# Altium PCB HCD_PCB.PcbDoc (part 2 of 4)
Units mil, origin at the board's own origin, x right, y up, seen from the top; angles counter-clockwise.
Board outline 2762.03 x 3428.03 mil, 2 copper layers (Top Layer, Bottom Layer), stack 57 mil thick; 112 components, 73 nets, 363 pads, 145 vias.
Unrouted connection lines stored in the file: 1.
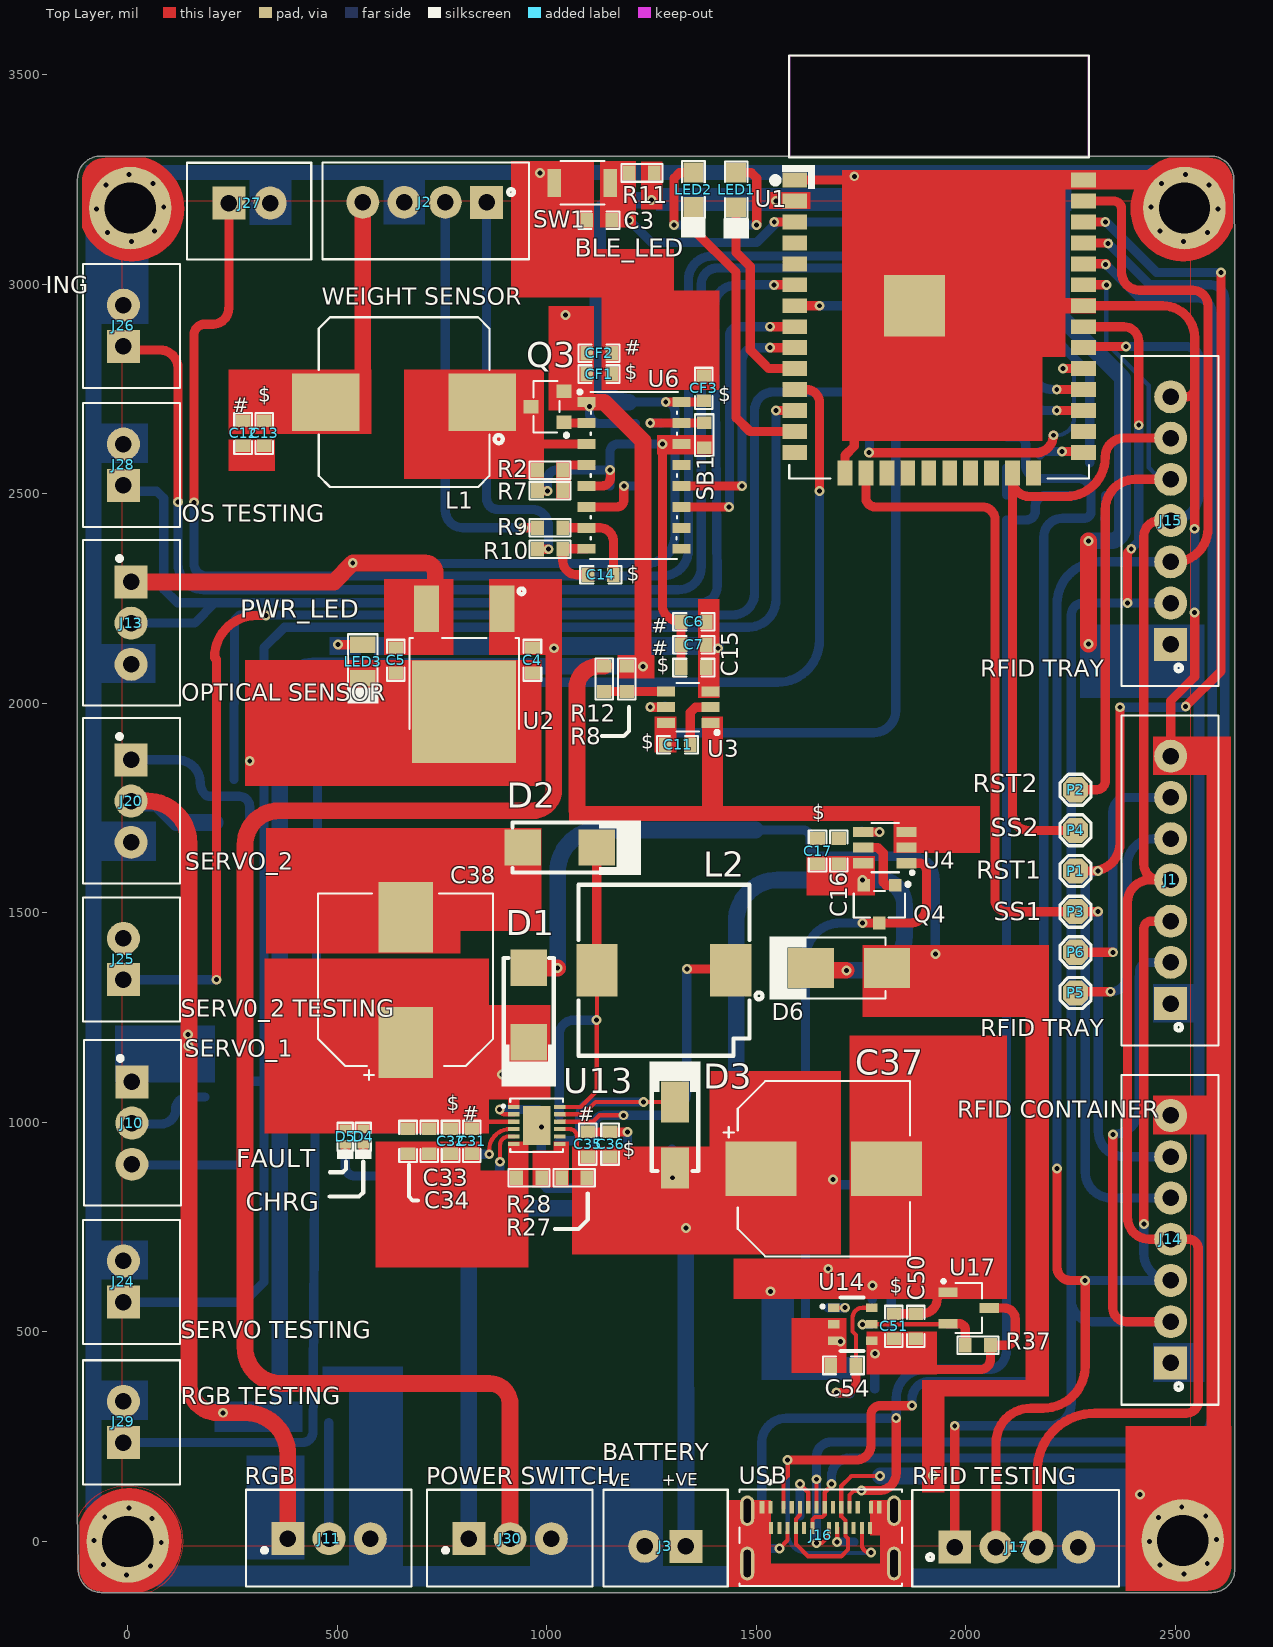
[diagram p0: Top Layer view]

## Part data (continued)
L2: library part SLF10145T-100M2R5-PF, "FIXED IND 10UH 2.5A 43.7 MOHM", Case/Package=Nonstandard, Current Rating=2.5A, DC Resistance (DCR)=36.4mR, Inductance Tolerance=20%, Manufacturer=TDK, Max Operating Temperature=105°C, Min Operating Temperature=-40°C, Package Quantity=500, Rated Current-Max=3A, Resistor Type=Wirewound, Supplier Part Number 1=445-1975-6-ND, Test Frequency=1kHz, ComponentLink1Description=http://www.farnell.com/datasheets/1838969.pdf?src-supplier=Element14, ComponentLink1URL=http://www.farnell.com/datasheets/1838969.pdf?src-supplier=Element14, ComponentLink2Description=http://uk.rs-online.com/webdocs/14e9/0900766b814e91a9.pdf?src-supplier=RSComponents, ComponentLink2URL=http://uk.rs-online.com/webdocs/14e9/0900766b814e91a9.pdf?src-supplier=RSComponents, ComponentLink3Description=http://components.arrow.com/part/dataview/42010891S8914805N1165?src-supplier=Arrow+Electronics, ComponentLink3URL=http://components.arrow.com/part/dataview/42010891S8914805N1165?src-supplier=Arrow+Electronics, ComponentLink4Description=http://datasheet.iiic.cc/tdk/SLF10145T-100M2R5-PF.pdf?src-supplier=IIIC, ComponentLink4URL=http://datasheet.iiic.cc/tdk/SLF10145T-100M2R5-PF.pdf?src-supplier=IIIC, Core Material=Ferrite, DC Current=2.5A, Depth=10.4mm, Height=4.5mm, Height - Seated (Max)=0.189inch, Inductance=10uH, Lead Free="Lead Free", Length=10.1mm, Manufacturer Part Number=SLF10145T-100M2R5-PF, Max DC Current=2.5A, Military Standard=Not, Mount="Surface Mount", Number of Pins=2, Packaging="Tape and Reel", Pricing 1="1=1.05, 10=0.975, 25=0.9, 50=0.75, 100=0.705, 250=0.63 (USD)", Radiation Hardening=No, REACH SVHC="No SVHC", RMS Current (Irms)=3A, RoHS Compliant=Yes, Saturation Current=3A, Series=SLF, Shielding=Shielded, Stock 1=3269, Supplier 1=Digi-Key, Termination=SMD/SMT, Tolerance=20%, Width=0.398inch
LED1: "Yellow 2 x 1.25 x 1.1 mm 130° Water Clear 112 mcd 1.8 V LED Surface Mount", Case Code (Imperial)=0805, Case Code (Metric)=2012, Color=Yellow, Forward Current=30mA, Forward Voltage=2.4V, Lens Color=Colorless, Manufacturer="Vishay Lite-On", Max Operating Temperature=85°C, Min Operating Temperature=-55°C, Package Quantity=1, Power Dissipation=75mW, Reverse Voltage=5V, Supplier Part Number 1=160-1416-1-ND, Test Current=20mA, Case/Package=0805, Category=LEDs, ComponentLink1Description=https://datasheet.ciiva.com/11774/0900766b80dc027c-11774116.pdf?src-supplier=RSComponents, ComponentLink1URL=https://datasheet.ciiva.com/11774/0900766b80dc027c-11774116.pdf?src-supplier=RSComponents, ComponentLink2Description=https://datasheet.ciiva.com/12400/lite-on-ltst-c170kskt-187240-12400806.pdf?src-supplier=Mouser, ComponentLink2URL=https://datasheet.ciiva.com/12400/lite-on-ltst-c170kskt-187240-12400806.pdf?src-supplier=Mouser, ComponentLink3Description=https://datasheet.ciiva.com/16203/ltst-c170kskt-16203829.pdf?src-supplier=Future+Electronics, ComponentLink3URL=https://datasheet.ciiva.com/16203/ltst-c170kskt-16203829.pdf?src-supplier=Future+Electronics, ComponentLink4Description=https://datasheet.ciiva.com/15118/getdatasheetpartid-214541-15118098.pdf?src-supplier=Verical, ComponentLink4URL=https://datasheet.ciiva.com/15118/getdatasheetpartid-214541-15118098.pdf?src-supplier=Verical, ComponentLink5Description=https://datasheet.ciiva.com/2110/s-110-ltst-c170kskt-2110046.pdf?src-supplier=Digi-Key, ComponentLink5URL=https://datasheet.ciiva.com/2110/s-110-ltst-c170kskt-2110046.pdf?src-supplier=Digi-Key, ComponentLink6Description=https://datasheet.ciiva.com/2110/s-110-ltst-c170kskt-2110045.pdf?src-supplier=Digi-Key, ComponentLink6URL=https://datasheet.ciiva.com/2110/s-110-ltst-c170kskt-2110045.pdf?src-supplier=Digi-Key, ComponentLink7Description=https://datasheet.ciiva.com/2110/s-110-ltst-c170kskt-2110047.pdf?src-supplier=Digi-Key, ComponentLink7URL=https://datasheet.ciiva.com/2110/s-110-ltst-c170kskt-2110047.pdf?src-supplier=Digi-Key, Depth=1.25mm, Dominant Wavelength=587nm, Height=1.1mm, Illumination Color=Yellow, Lead Free="Lead Free", Length=2mm, Lens Style=Diffused,Colorless,Rectangular,Clear, Lens Transparency=Clear, Luminous Intensity=112mcd, Manufacturer Part Number=LTST-C170KSKT, Mount="Surface Mount", Number of Elements=1, Number of LEDs=1, Number of Pins=2, Packaging="Tape and Reel", Power Rating=75mW, Pricing 1="1=0.31000, 10=0.16900, 100=0.07860, 500=0.07260, 1000=0.05687 (USD)", Radiation Hardening=No, RoHS=Yes, RoHS Compliant=Yes, Series="CHIPLED 0805", Stock 1=4224, Supplier 1=Digi-Key, Viewing Angle=130°, Wavelength=588nm, Width=1.25mm
LED2: "LED BLUE 0805 SMD", Emitted Color=Blue, Manufacturer="Everlight Elec", Package=0805
LED3: "LED GREEN 574nm 2-Pin Chip 0805 SMD", Case Code (Imperial)=0805, Case Code (Metric)=2012, Color=Green, Forward Current=30mA, Forward Voltage=2.4V, Lens Color=Colorless, Manufacturer="Vishay Lite-On", Max Operating Temperature=85°C, Min Operating Temperature=-55°C, Package Quantity=1, Power Dissipation=75mW, Reverse Voltage=5V, Supplier Part Number 1=6920947P, Test Current=20mA, Case/Package=0805, Category=LEDs, ComponentLink1Description=https://datasheet.ciiva.com/11774/0900766b80dc0298-11774377.pdf?src-supplier=RSComponents, ComponentLink1URL=https://datasheet.ciiva.com/11774/0900766b80dc0298-11774377.pdf?src-supplier=RSComponents, ComponentLink2Description=https://datasheet.ciiva.com/12400/lite-on-ltst-c171kgkt-187692-12400799.pdf?src-supplier=Mouser, ComponentLink2URL=https://datasheet.ciiva.com/12400/lite-on-ltst-c171kgkt-187692-12400799.pdf?src-supplier=Mouser, ComponentLink3Description=https://datasheet.ciiva.com/16200/lite-on20ltst-c171kgkt-16200100.pdf?src-supplier=Future+Electronics, ComponentLink3URL=https://datasheet.ciiva.com/16200/lite-on20ltst-c171kgkt-16200100.pdf?src-supplier=Future+Electronics, ComponentLink4Description=https://datasheet.ciiva.com/15118/getdatasheetpartid-214542-15118099.pdf?src-supplier=Verical, ComponentLink4URL=https://datasheet.ciiva.com/15118/getdatasheetpartid-214542-15118099.pdf?src-supplier=Verical, ComponentLink5Description=https://datasheet.ciiva.com/2110/s-110-ltst-c171kgkt-2110073.pdf?src-supplier=Digi-Key, ComponentLink5URL=https://datasheet.ciiva.com/2110/s-110-ltst-c171kgkt-2110073.pdf?src-supplier=Digi-Key, ComponentLink6Description=https://datasheet.ciiva.com/2110/s-110-ltst-c171kgkt-2110072.pdf?src-supplier=Digi-Key, ComponentLink6URL=https://datasheet.ciiva.com/2110/s-110-ltst-c171kgkt-2110072.pdf?src-supplier=Digi-Key, ComponentLink7Description=https://datasheet.ciiva.com/2110/s-110-ltst-c171kgkt-2110074.pdf?src-supplier=Digi-Key, ComponentLink7URL=https://datasheet.ciiva.com/2110/s-110-ltst-c171kgkt-2110074.pdf?src-supplier=Digi-Key, Depth=1.25mm, Dominant Wavelength=571nm, Height=0.8mm, Illumination Color=Green, Lead Free="Lead Free", Length=2mm, Lens Style=Rectangular,Diffused,Colorless,Clear, Lens Transparency=Clear, Luminous Intensity=35mcd, Manufacturer Part Number=LTST-C171KGKT, Mount="Surface Mount", Number of Elements=1, Number of LEDs=1, Number of Pins=2, Packaging="Tape and Reel", Power Rating=75mW, Pricing 1="250=0.05900, 500=0.05000, 1250=0.04200, 2500=0.03900 (GBP)", Radiation Hardening=No, RoHS=Yes, RoHS Compliant=Yes, Series="CHIPLED 0805", Stock 1=14250, Supplier 1=RSComponents, Viewing Angle=130°, Wavelength=574nm, Width=1.25mm
P1 P2 P3 P4 P5 P6: library part "TEST POINT", "Test Point ON"
Q1 Q2: "TRANS NPN 40V 0.6A SMD SOT23-3", Case/Package=SOT-23, Collector Base Voltage (VCBO)=75V, Collector Emitter Breakdown Voltage=40V, Collector Emitter Saturation Voltage=1V, Continuous Collector Current=600mA, Current=1A, Emitter Base Voltage (VEBO)=6V, Frequency=300MHz, Manufacturer=Diodes, Max Operating Temperature=150°C, Max Power Dissipation=300mW, Min Operating Temperature=-55°C, Package Quantity=3000, Power Dissipation=350mW, Supplier Part Number 1=MMBT2222A-FDIDKR-ND, Collector Emitter Voltage (VCEO)=40V, ComponentLink1Description=http://www.diodes.com/datasheets/ds30041.pdf?src-supplier=Future+Electronics, ComponentLink1URL=http://www.diodes.com/datasheets/ds30041.pdf?src-supplier=Future+Electronics, ComponentLink2Description=http://www.diodes.com/datasheets/ds30041.pdf?src-supplier=Avnet, ComponentLink2URL=http://www.diodes.com/datasheets/ds30041.pdf?src-supplier=Avnet, ComponentLink3Description=https://www.verical.com/server-webapp/html/getDatasheet?partID=82692&src-supplier=Verical, ComponentLink3URL=https://www.verical.com/server-webapp/html/getDatasheet?partID=82692&src-supplier=Verical, ComponentLink4Description=https://www.diodes.com/assets/Datasheets/ds30041.pdf?src-supplier=Digi-Key, ComponentLink4URL=https://www.diodes.com/assets/Datasheets/ds30041.pdf?src-supplier=Digi-Key, ComponentLink5Description=http://www.diodes.com/datasheets/ds30041.pdf?src-supplier=Avnet+Europe, ComponentLink5URL=http://www.diodes.com/datasheets/ds30041.pdf?src-supplier=Avnet+Europe, ComponentLink6Description=http://www.diodes.com/datasheets/ds30041.pdf?src-supplier=Element14, ComponentLink6URL=http://www.diodes.com/datasheets/ds30041.pdf?src-supplier=Element14, Contact Plating=Matte,Tin, Current Rating=600mA, Element Configuration=Single, Gain Bandwidth Product=300MHz, Height=1mm, hFE Min=100, Lead Free="Lead Free", Length=3.05mm, Manufacturer Part Number=MMBT2222A-7-F, Max Breakdown Voltage=40V, Max Collector Current=600mA, Max Frequency=300MHz, Mount="Surface Mount", Number of Elements=1, Number of Pins=3, Packaging="Tape and Reel", Polarity=NPN, Pricing 1="1=0.15, 10=0.134, 100=0.0729, 500=0.04486, 1000=0.03059 (USD)", Radiation Hardening=No, REACH SVHC="No SVHC", Stock 1=2471182, Supplier 1=Digi-Key, Termination=SMD/SMT, Transition Frequency=300MHz, Voltage=40V, Voltage Rating (DC)=40V, Weight=0.000282oz, Width=1.4mm
Q3: "TRANS PNP 40V 600MA SOT23-3", Case/Package=SOT-23-3, Collector Base Voltage (VCBO)=40V, Collector Emitter Saturation Voltage=-750mV, Collector-emitter Voltage-Max=750mV, Current Rating=-600mA, Emitter Base Voltage (VEBO)=5V, Frequency=200MHz, Manufacturer="ON Semiconductor", Max Collector Current=600mA, Max Operating Temperature=150°C, Max Power Dissipation=300mW, Min Operating Temperature=-55°C, Package Quantity=1, Supplier Part Number 1=88H4792, Voltage Rating (DC)=-40V, Category=BJTs, Collector Emitter Breakdown Voltage=40V, Collector Emitter Voltage (VCEO)=40V, ComponentLink1Description=http://www.onsemi.com/pub/Collateral/MMBT4403LT1-D.PDF?src-supplier=Avnet, ComponentLink1URL=http://www.onsemi.com/pub/Collateral/MMBT4403LT1-D.PDF?src-supplier=Avnet, ComponentLink2Description=http://www.onsemi.com/pub/Collateral/MMBT4403LT1-D.PDF?src-supplier=Digi-Key, ComponentLink2URL=http://www.onsemi.com/pub/Collateral/MMBT4403LT1-D.PDF?src-supplier=Digi-Key, ComponentLink3Description=https://datasheet.ciiva.com/4722/mmbt4403lt1-d-101652-4722132.pdf?src-supplier=Mouser, ComponentLink3URL=https://datasheet.ciiva.com/4722/mmbt4403lt1-d-101652-4722132.pdf?src-supplier=Mouser, ComponentLink4Description=https://datasheet.ciiva.com/15138/getdatasheetpartid-44367-15138750.pdf?src-supplier=Verical, ComponentLink4URL=https://datasheet.ciiva.com/15138/getdatasheetpartid-44367-15138750.pdf?src-supplier=Verical, ComponentLink5Description=https://datasheet.ciiva.com/14546/70099534-14546501.pdf?src-supplier=Allied+Electronics, ComponentLink5URL=https://datasheet.ciiva.com/14546/70099534-14546501.pdf?src-supplier=Allied+Electronics, ComponentLink6Description=https://datasheet.ciiva.com/7972/mmbt4403lt1-d-7972391.pdf?src-supplier=Element14, ComponentLink6URL=https://datasheet.ciiva.com/7972/mmbt4403lt1-d-7972391.pdf?src-supplier=Element14, ComponentLink7Description=https://datasheet.ciiva.com/11198/mmbt4403lt1-d-11198713.pdf?src-supplier=Avnet, ComponentLink7URL=https://datasheet.ciiva.com/11198/mmbt4403lt1-d-11198713.pdf?src-supplier=Avnet, ComponentLink8Description=https://datasheet.ciiva.com/16478/mmbt4403lt1-d-16478554.pdf?src-supplier=Avnet+Asia, ComponentLink8URL=https://datasheet.ciiva.com/16478/mmbt4403lt1-d-16478554.pdf?src-supplier=Avnet+Asia, ComponentLink9Description=https://datasheet.ciiva.com/976/mmbt4403lt1-d-976347.pdf?src-supplier=Digi-Key, ComponentLink9URL=https://datasheet.ciiva.com/976/mmbt4403lt1-d-976347.pdf?src-supplier=Digi-Key, ComponentLink10Description=https://datasheet.ciiva.com/16396/mmbt4403lt1-d-16396635.pdf?src-supplier=Future+Electronics, ComponentLink10URL=https://datasheet.ciiva.com/16396/mmbt4403lt1-d-16396635.pdf?src-supplier=Future+Electronics, ComponentLink11Description=https://datasheet.ciiva.com/976/mmbt4403lt1-d-976348.pdf?src-supplier=Digi-Key, ComponentLink11URL=https://datasheet.ciiva.com/976/mmbt4403lt1-d-976348.pdf?src-supplier=Digi-Key, ComponentLink12Description=https://datasheet.ciiva.com/976/mmbt4403lt1-d-976349.pdf?src-supplier=Digi-Key, ComponentLink12URL=https://datasheet.ciiva.com/976/mmbt4403lt1-d-976349.pdf?src-supplier=Digi-Key, ComponentLink13Description=https://datasheet.ciiva.com/25998/mmbt4403lt1-d-25998110.pdf?src-supplier=Avnet+Europe, ComponentLink13URL=https://datasheet.ciiva.com/25998/mmbt4403lt1-d-25998110.pdf?src-supplier=Avnet+Europe, Contact Plating=Tin,Matte, Element Configuration=Single, Gain Bandwidth Product=200MHz, Height=1.01mm, hFE Min=30, Lead Free="Lead Free", Length=3.04mm, Manufacturer Part Number=MMBT4403LT1G, Max Breakdown Voltage=40V, Max Frequency=200MHz, Number of Elements=1, Number of Pins=3, Packaging="Tape and Reel", Polarity=PNP, Power Dissipation=300mW, Pricing 1="1=0.14200, 10=0.09900, 100=0.05400, 500=0.04300 (USD)", Radiation Hardening=No, REACH SVHC="No SVHC", RoHS=Yes, RoHS Compliant=Yes, Series=-, Stock 1=25249, Supplier 1=Avnet, Transition Frequency=200MHz, Width=1.4mm
Q4: "MOSFET P-CH 12V 2.6A SUPERSOT3", Case/Package=TO-236-3, Continuous Drain Current (ID)=2.6A, Current=26A, Current Rating=-2.6A, Drain to Source Breakdown Voltage=-12V, Drain to Source Resistance=40mR, Drain to Source Voltage (Vdss)=12V, Drain-source On Resistance-Max=40MR, Gate to Source Voltage (Vgs)=8V, Input Capacitance=1.138nF, Manufacturer="ON Semiconductor / Fairchild", Max Operating Temperature=150°C, Max Power Dissipation=500mW, Min Operating Temperature=-55°C, Package Quantity=3000, Supplier Part Number 1=FDN306PCT-ND, Threshold Voltage=-600mV, Category=MOSFETs, ComponentLink1Description=https://datasheet.ciiva.com/6383/fdn306p-6383301.pdf?src-supplier=Digi-Key, ComponentLink1URL=https://datasheet.ciiva.com/6383/fdn306p-6383301.pdf?src-supplier=Digi-Key, ComponentLink2Description=https://datasheet.ciiva.com/4439/fdn306p-50876-4439911.pdf?src-supplier=Mouser, ComponentLink2URL=https://datasheet.ciiva.com/4439/fdn306p-50876-4439911.pdf?src-supplier=Mouser, ComponentLink3Description=https://datasheet.ciiva.com/27050/889760-27050636.pdf?src-supplier=Jameco, ComponentLink3URL=https://datasheet.ciiva.com/27050/889760-27050636.pdf?src-supplier=Jameco, ComponentLink4Description=https://datasheet.ciiva.com/14170/fdn306p-eng-tds-14170925.pdf?src-supplier=Distrelec, ComponentLink4URL=https://datasheet.ciiva.com/14170/fdn306p-eng-tds-14170925.pdf?src-supplier=Distrelec, ComponentLink5Description=https://datasheet.ciiva.com/22700/264983-22700885.pdf?src-supplier=Element14, ComponentLink5URL=https://datasheet.ciiva.com/22700/264983-22700885.pdf?src-supplier=Element14, ComponentLink6Description=https://datasheet.ciiva.com/26144/fdn306p-26144214.pdf?src-supplier=Avnet+Europe, ComponentLink6URL=https://datasheet.ciiva.com/26144/fdn306p-26144214.pdf?src-supplier=Avnet+Europe, ComponentLink7Description=https://datasheet.ciiva.com/6383/fdn306p-6383304.pdf?src-supplier=Digi-Key, ComponentLink7URL=https://datasheet.ciiva.com/6383/fdn306p-6383304.pdf?src-supplier=Digi-Key, ComponentLink8Description=https://datasheet.ciiva.com/11175/fdn306p-11175160.pdf?src-supplier=Avnet, ComponentLink8URL=https://datasheet.ciiva.com/11175/fdn306p-11175160.pdf?src-supplier=Avnet, ComponentLink9Description=https://datasheet.ciiva.com/6383/fdn306p-6383306.pdf?src-supplier=Digi-Key, ComponentLink9URL=https://datasheet.ciiva.com/6383/fdn306p-6383306.pdf?src-supplier=Digi-Key, ComponentLink10Description=https://datasheet.ciiva.com/17275/fdn306p-17275114.pdf?src-supplier=Future+Electronics, ComponentLink10URL=https://datasheet.ciiva.com/17275/fdn306p-17275114.pdf?src-supplier=Future+Electronics, ComponentLink11Description=https://datasheet.ciiva.com/22655/fdn306p-22655327.pdf?src-supplier=Element14, ComponentLink11URL=https://datasheet.ciiva.com/22655/fdn306p-22655327.pdf?src-supplier=Element14, Contact Plating=Tin,Matte, Dual Supply Voltage=-12V, Element Configuration=Single, Fall Time=10ns, Height=0.94mm, Lead Free="Lead Free", Length=2.92mm, Manufacturer Part Number=FDN306P, Mount="Surface Mount", Nominal Vgs=-600mV, Number of Elements=1, Number of Pins=3, On-State Resistance=40MR, Packaging="Tape and Reel", Polarity=P-CHANNEL, Power Dissipation=500mW, Pricing 1="1=0.59000, 10=0.50700, 25=0.47360, 100=0.37880, 500=0.29766, 1000=0.23001 (USD)", Radiation Hardening=No, Rds On Max=40mR, REACH SVHC="No SVHC", Rise Time=10ns, RoHS=Yes, RoHS Compliant=Yes, Series=PowerTrench®, Stock 1=12409, Supplier 1=Digi-Key, Termination=SMD/SMT, Turn-Off Delay Time=38ns, Turn-On Delay Time=11ns, Voltage=12V, Voltage Rating (DC)=-12V, Width=1.4mm
R1 R9 R10 R15: library part RCA0603100RFKEAHP, "RES SMD 100 OHM 1% 1/4W 0603", Case Code (Imperial)=0603, Case Code (Metric)=1608, Manufacturer="Vishay Dale", Max Operating Temperature=155°C, Max Power Dissipation=250mW, Min Operating Temperature=-55°C, Resistor Type="Thick Film", Supplier Part Number 1=541-3244-2-ND, Temperature Coefficient=100ppm/°C, Tolerance=1%, Case/Package=0603, ComponentLink1Description=http://www.vishay.com/docs/20067/rcahp.pdf?src-supplier=Digi-Key, ComponentLink1URL=http://www.vishay.com/docs/20067/rcahp.pdf?src-supplier=Digi-Key, Features="Automotive AEC-Q200,Anti-Sulfur", Manufacturer Part Number=RCA0603100RFKEAHP, Number of Terminations=2, Packaging="Tape and Reel", Resistance=100R, RoHS Compliant=Yes, Stock 1=0, Supplier 1=Digi-Key
R2: library part ESR03EZPF2002, "RES SMD 20K OHM 1% 1/4W 0603", Case Code (Imperial)=0603, Case Code (Metric)=1608, Manufacturer=Rohm, Max Operating Temperature=155°C, Max Power Dissipation=250mW, Min Operating Temperature=-55°C, Package Quantity=1, Resistance=20kR, Resistor Type="Thick Film", Supplier Part Number 1=RHM20.0KADCT-ND, Temperature Coefficient=100ppm/°C, Tolerance=1%, Case/Package=0603, ComponentLink1Description=https://www.rohm.com/datasheet/ESR01MZPF/esr-e?src-supplier=Digi-Key, ComponentLink1URL=https://www.rohm.com/datasheet/ESR01MZPF/esr-e?src-supplier=Digi-Key, Features="Automotive AEC-Q200", Height=0.022inch, Length=0.063inch, Manufacturer Part Number=ESR03EZPF2002, Number of Terminations=2, Packaging="Tape and Reel", Pricing 1="1=0.13, 10=0.12, 100=0.046, 1000=0.02024, 2500=0.01748 (USD)", RoHS Compliant=Yes, Series=ESR, Stock 1=4737, Supplier 1=Digi-Key, Width=0.031inch
R3 R4 R32 RF1: library part CRGH0603J10K, "RES SMD 10K OHM 5% 1/5W 0603", Case/Package=0603, Case Code (Metric)=1608, Manufacturer="TE Connectivity Holsworthy", Max Operating Temperature=125°C, Min Operating Temperature=-55°C, Number of Resistors=1, Power Rating=200mW, Resistance=10kR, Resistance Tolerance=5%, Resistor Type="Thick Film,Power resistor", Supplier Part Number 1=A126394DKR-ND, Temperature Coefficient=100ppm/°C, Voltage Rating=50V, Case Code (Imperial)=0603, ComponentLink1Description=http://www.farnell.com/datasheets/2167052.pdf?src-supplier=Element14, ComponentLink1URL=http://www.farnell.com/datasheets/2167052.pdf?src-supplier=Element14, ComponentLink2Description=https://www.rohm.com/datasheet/ESR01MZPF/esr-e?src-supplier=Digi-Key, ComponentLink2URL=https://www.rohm.com/datasheet/ESR01MZPF/esr-e?src-supplier=Digi-Key, ComponentLink3Description=http://www.farnell.com/datasheets/2007183.pdf?src-supplier=Element14, ComponentLink3URL=http://www.farnell.com/datasheets/2007183.pdf?src-supplier=Element14, Depth=0.8mm, ELV=Compliant, Height=0.45mm, Length=1.6mm, Manufacturer Part Number=CRGH0603J10K, Mount="Surface Mount", Number of Terminations=2, Packaging="Tape and Reel", Pricing 1="1=0.1, 10=0.049, 100=0.02, 1000=0.00899, 2500=0.0078 (USD)", REACH SVHC="No SVHC", RoHS Compliant=Yes, Series=CRGH, Stock 1=85818, Supplier 1=Digi-Key, Technology="THICK FILM", Termination=Solder, Tolerance=5%, Voltage Rating (DC)=50V, Width=0.8mm
R5: library part CRCW0603301KFKEB, "RES SMD 301K OHM 1% 1/10W 0603", Case Code (Imperial)=0603, Case Code (Metric)=1608, Manufacturer="Vishay Dale", Max Operating Temperature=155°C, Max Power Dissipation=100mW, Min Operating Temperature=-55°C, Package Quantity=10000, Resistance=301kR, Resistor Type="Thick Film", Supplier Part Number 1=541-CRCW0603301KFKEBDKR-ND, Temperature Coefficient=100ppm/°C, Tolerance=1%, Voltage Rating=75V, Case/Package=0603, ComponentLink1Description=http://www.mouser.com/ds/2/427/dcrcwe3-109170.pdf?src-supplier=Mouser, ComponentLink1URL=http://www.mouser.com/ds/2/427/dcrcwe3-109170.pdf?src-supplier=Mouser, ComponentLink2Description=http://components.arrow.com/part/dataview/0323_06076993?src-supplier=Arrow+Europe, ComponentLink2URL=http://components.arrow.com/part/dataview/0323_06076993?src-supplier=Arrow+Europe, ComponentLink3Description=http://www.vishay.com/docs/20035/dcrcwe3.pdf?src-supplier=Digi-Key, ComponentLink3URL=http://www.vishay.com/docs/20035/dcrcwe3.pdf?src-supplier=Digi-Key, Construction=Rectangular, Depth=0.85mm, Features="Automotive AEC-Q200", Height=0.02inch, Lead Free="Lead Free", Length=1.55mm, Manufacturer Part Number=CRCW0603301KFKEB, Military Standard=Not, Number of Terminations=2, Packaging="Tape and Reel", Power Rating=100mW, Pricing 1="1=0.1, 10=0.036, 100=0.0145, 1000=0.00652, 2500=0.00566, 5000=0.00468 (USD)", RoHS Compliant=Yes, Series=CRCW, Stock 1=17460, Supplier 1=Digi-Key, Termination=SMD/SMT, Weight=7.1E-05oz, Width=0.85mm
R6: library part CRGH0603J100K, "RES SMD 100K OHM 5% 1/5W 0603", Case Code (Imperial)=0603, Case Code (Metric)=1608, Manufacturer="TE Connectivity", Max Operating Temperature=125°C, Min Operating Temperature=-55°C, Number of Resistors=1, Power Rating=200mW, Resistance=100kR, Resistance Tolerance=5%, Resistor Type="Thick Film,Power resistor", Supplier Part Number 1=A126393DKR-ND, Temperature Coefficient=100ppm/°C, Voltage Rating=50V, Case/Package=0603, ComponentLink1Description=http://www.farnell.com/datasheets/2007183.pdf?src-supplier=Element14, ComponentLink1URL=http://www.farnell.com/datasheets/2007183.pdf?src-supplier=Element14, Depth=0.8mm, ELV=Compliant, Height=0.45mm, Length=1.6mm, Manufacturer Part Number=CRGH0603J100K, Mount="Surface Mount", Number of Terminations=2, Packaging="Tape and Reel", Pricing 1="1=0.1, 10=0.049, 100=0.02, 1000=0.00899, 2500=0.0078 (USD)", REACH SVHC="No SVHC", RoHS Compliant=Yes, Series=CRGH, Stock 1=23277, Supplier 1=Digi-Key, Technology="THICK FILM", Termination=Solder, Tolerance=5%, Voltage Rating (DC)=50V, Width=0.8mm
R7: library part ERJ-PA3J822V, "RES SMD 8.2K OHM 5% 1/4W 0603", Case Code (Imperial)=0603, Case Code (Metric)=1608, Manufacturer=Panasonic, Max Operating Temperature=155°C, Max Power Dissipation=250mW, Min Operating Temperature=-55°C, Resistance=8.2kR, Resistor Type="Thick Film", Supplier Part Number 1=P8.2KBZDKR-ND, Temperature Coefficient=200ppm/°C, Tolerance=5%, Case/Package=0603, ComponentLink1Description=https://industrial.panasonic.com/cdbs/www-data/pdf/RDO0000/AOA0000C331.pdf?src-supplier=Digi-Key, ComponentLink1URL=https://industrial.panasonic.com/cdbs/www-data/pdf/RDO0000/AOA0000C331.pdf?src-supplier=Digi-Key, Features="Automotive AEC-Q200", Height=0.018inch, Length=0.063inch, Manufacturer Part Number=ERJ-PA3J822V, Number of Terminations=2, Packaging="Tape and Reel", Pricing 1="1=0.1, 10=0.09, 100=0.0345, 1000=0.01518, 2500=0.01311 (USD)", Stock 1=19862, Supplier 1=Digi-Key, Width=0.031inch
R8: library part RC0603FR-0754K9L, "RES SMD 54.9K OHM 1% 1/10W 0603", Case Code (Imperial)=0603, Case Code (Metric)=1608, Manufacturer=Yageo, Max Operating Temperature=155°C, Max Power Dissipation=100mW, Min Operating Temperature=-55°C, Resistance=54.9kR, Resistor Type="Thick Film", Supplier Part Number 1=311-54.9KHRCT-ND, Temperature Coefficient=100ppm/°C, Tolerance=1%, Voltage Rating=50V, Working Voltage=75V, Case/Package=0603, ComponentLink1Description=http://www.mouser.com/catalog/specsheets/RC0603.pdf?src-supplier=Mouser, ComponentLink1URL=http://www.mouser.com/catalog/specsheets/RC0603.pdf?src-supplier=Mouser, ComponentLink2Description=https://www.verical.com/server-webapp/html/getDatasheet?partID=37594&src-supplier=Verical, ComponentLink2URL=https://www.verical.com/server-webapp/html/getDatasheet?partID=37594&src-supplier=Verical, Construction=Rectangular, Depth=0.8mm, Features="Moisture Resistant", Height=0.45mm, Lead Free="Lead Free", Length=1.6mm, Manufacturer Part Number=RC0603FR-0754K9L, Military Standard=Not, Number of Terminations=2, Packaging="Tape and Reel", Power Rating=100mW, Pricing 1="1=0.1, 10=0.024, 100=0.0097, 1000=0.00436, 2500=0.00378 (USD)", RoHS Compliant=Yes, Series=RC, Stock 1=178374, Supplier 1=Digi-Key, Technology="THICK FILM", Termination=SMD/SMT, Voltage Rating (DC)=50V, Width=0.8mm
R11 R12 R13: library part CRGH0603J10K, "RES SMD 10K OHM 5% 1/5W 0603", Case Code (Imperial)=0603, Case Code (Metric)=1608, Manufacturer="TE Connectivity Holsworthy", Max Operating Temperature=125°C, Min Operating Temperature=-55°C, Number of Resistors=1, Power Rating=200mW, Resistance=10kR, Resistance Tolerance=5%, Resistor Type="Thick Film,Power resistor", Supplier Part Number 1=A126394DKR-ND, Temperature Coefficient=100ppm/°C, Voltage Rating=50V, Case/Package=0603, ComponentLink1Description=http://www.farnell.com/datasheets/2167052.pdf?src-supplier=Element14, ComponentLink1URL=http://www.farnell.com/datasheets/2167052.pdf?src-supplier=Element14, ComponentLink2Description=https://www.rohm.com/datasheet/ESR01MZPF/esr-e?src-supplier=Digi-Key, ComponentLink2URL=https://www.rohm.com/datasheet/ESR01MZPF/esr-e?src-supplier=Digi-Key, ComponentLink3Description=http://www.farnell.com/datasheets/2007183.pdf?src-supplier=Element14, ComponentLink3URL=http://www.farnell.com/datasheets/2007183.pdf?src-supplier=Element14, Depth=0.8mm, ELV=Compliant, Height=0.45mm, Length=1.6mm, Manufacturer Part Number=CRGH0603J10K, Mount="Surface Mount", Number of Terminations=2, Packaging="Tape and Reel", Pricing 1="1=0.1, 10=0.049, 100=0.02, 1000=0.00899, 2500=0.0078 (USD)", REACH SVHC="No SVHC", RoHS Compliant=Yes, Series=CRGH, Stock 1=85818, Supplier 1=Digi-Key, Technology="THICK FILM", Termination=Solder, Tolerance=5%, Voltage Rating (DC)=50V, Width=0.8mm
R14: library part AC0603JR-07470KL, "RES SMD 470K OHM 5% 1/10W 0603", Case Code (Imperial)=0603, Case Code (Metric)=1608, Manufacturer=Yageo, Max Operating Temperature=155°C, Max Power Dissipation=100mW, Min Operating Temperature=-55°C, Resistance=470kR, Resistor Type="Thick Film", Supplier Part Number 1=YAG3672DKR-ND, Temperature Coefficient=100ppm/°C, Tolerance=5%, Voltage Rating=50V, Case/Package=0603, ComponentLink1Description=https://datasheet.ciiva.com/11820/0900766b80808d64-11820639.pdf?src-supplier=RSComponents, ComponentLink1URL=https://datasheet.ciiva.com/11820/0900766b80808d64-11820639.pdf?src-supplier=RSComponents, ComponentLink2Description=https://datasheet.ciiva.com/2487/rr-data-sheet-2487286.pdf?src-supplier=Digi-Key, ComponentLink2URL=https://datasheet.ciiva.com/2487/rr-data-sheet-2487286.pdf?src-supplier=Digi-Key, ComponentLink3Description=https://datasheet.ciiva.com/7984/87330-7984374.pdf?src-supplier=Element14, ComponentLink3URL=https://datasheet.ciiva.com/7984/87330-7984374.pdf?src-supplier=Element14, ComponentLink4Description=https://datasheet.ciiva.com/2487/rr-data-sheet-2487287.pdf?src-supplier=Digi-Key, ComponentLink4URL=https://datasheet.ciiva.com/2487/rr-data-sheet-2487287.pdf?src-supplier=Digi-Key, ComponentLink5Description=https://datasheet.ciiva.com/2487/rr-data-sheet-2487288.pdf?src-supplier=Digi-Key, ComponentLink5URL=https://datasheet.ciiva.com/2487/rr-data-sheet-2487288.pdf?src-supplier=Digi-Key, ComponentLink6Description=https://datasheet.ciiva.com/5759/87330-5759049.pdf?src-supplier=Farnell, ComponentLink6URL=https://datasheet.ciiva.com/5759/87330-5759049.pdf?src-supplier=Farnell, ComponentLink7Description=http://www.mouser.com/ds/2/447/yageodocoutput-1111992.pdf?src-supplier=Mouser, ComponentLink7URL=http://www.mouser.com/ds/2/447/yageodocoutput-1111992.pdf?src-supplier=Mouser, Features="Moisture Resistant,Automotive AEC-Q200", Height=0.022inch, Length=0.063inch, Manufacturer Part Number=AC0603JR-07470KL, Number of Terminations=2, Packaging="Tape and Reel", Power Rating=100mW, Pricing 1="1=0.1, 10=0.024, 100=0.0097, 1000=0.0044, 2500=0.0038 (USD)", RoHS Compliant=Yes, Series=AC, Stock 1=71, Supplier 1=Digi-Key, Termination=SMD/SMT, Weight=7.1E-05oz, Width=0.8mm
R16: library part ERA3VEB4700V, "RES  0.1W, 470½, 0.1%, 0603, RoHS", Manufacturer=Panasonic, Manufacturer Part Number=ERA-3VEB4700V, Supplier Part Number 1=10-ERA-3VEB4700VCT-ND, Category="Chip SMD Resistors", Pricing 1="1=0.61000, 10=0.43700, 100=0.22710, 1000=0.12230, 2500=0.11794 (USD)", RoHS=No, Stock 1=4950, Supplier 1=Digi-Key
R26: library part WSL2010R0500FEA, "RES 0.05 OHM 1% 1/2W 2010", Case Code (Imperial)=2010, Case Code (Metric)=5025, Manufacturer="Vishay Dale", Max Operating Temperature=170°C, Max Power Dissipation=500mW, Min Operating Temperature=-65°C, Package Quantity=1, Resistance=50mR, Resistor Type="Metal Element,Metal Strip", Supplier Part Number 1=WSLE-.05CT-ND, Temperature Coefficient=75ppm/°C, Tolerance=1%, Voltage Rating=150mV, Case/Package=2010, Category="Chip SMD Resistors", ComponentLink1Description=https://datasheet.ciiva.com/2483/wsl-2483729.pdf?src-supplier=Digi-Key, ComponentLink1URL=https://datasheet.ciiva.com/2483/wsl-2483729.pdf?src-supplier=Digi-Key, ComponentLink2Description=https://datasheet.ciiva.com/2483/wsl-2483730.pdf?src-supplier=Digi-Key, ComponentLink2URL=https://datasheet.ciiva.com/2483/wsl-2483730.pdf?src-supplier=Digi-Key, ComponentLink3Description=https://datasheet.ciiva.com/2483/wsl-2483731.pdf?src-supplier=Digi-Key, ComponentLink3URL=https://datasheet.ciiva.com/2483/wsl-2483731.pdf?src-supplier=Digi-Key, ComponentLink4Description=https://datasheet.ciiva.com/7695/wsl-7695158.pdf?src-supplier=Element14, ComponentLink4URL=https://datasheet.ciiva.com/7695/wsl-7695158.pdf?src-supplier=Element14, ComponentLink5Description=https://datasheet.ciiva.com/16215/wsl-16215947.pdf?src-supplier=Future+Electronics, ComponentLink5URL=https://datasheet.ciiva.com/16215/wsl-16215947.pdf?src-supplier=Future+Electronics, ComponentLink6Description=https://datasheet.ciiva.com/17177/wsl-17177243.pdf?src-supplier=Avnet+Europe, ComponentLink6URL=https://datasheet.ciiva.com/17177/wsl-17177243.pdf?src-supplier=Avnet+Europe, ComponentLink7Description=https://datasheet.ciiva.com/28621/1911169-28621837.pdf?src-supplier=Element14, ComponentLink7URL=https://datasheet.ciiva.com/28621/1911169-28621837.pdf?src-supplier=Element14, ComponentLink8Description=https://datasheet.ciiva.com/36857/442550-36857725.pdf?src-supplier=Element14, ComponentLink8URL=https://datasheet.ciiva.com/36857/442550-36857725.pdf?src-supplier=Element14, Contact Plating=Tin,Matte, Depth=2.54mm, Features="Moisture Resistant", Height=0.635mm, Lead Free="Lead Free", Length=5.08mm, Manufacturer Part Number=WSL2010R0500FEA, Military Standard=Not, Mount="Surface Mount", Number of Pins=2, Number of Terminations=2, Packaging="Tape and Reel", Power Rating=500mW, Pricing 1="1=0.92000, 10=0.81400, 25=0.74800, 50=0.68240, 100=0.59060, 250=0.49876, 500=0.42000, 1000=0.35000 (USD)", Radiation Hardening=No, REACH SVHC="No SVHC", RoHS=No, Stock 1=20000, Supplier 1=Digi-Key, Termination=SMD/SMT, Weight=0.001372oz, Width=0.1inch
R27: library part CRCW0603536KFKEA, "RES SMD 536K OHM 1% 1/10W 0603", Case Code (Imperial)=0603, Case Code (Metric)=1608, Manufacturer=Vishay, Max Operating Temperature=155°C, Max Power Dissipation=100mW, Min Operating Temperature=-55°C, Package Quantity=10, Resistance=536kR, Resistance Tolerance=1%, Resistor Type="Thick Film", Supplier Part Number 1=541-536KHCT-ND, Temperature Coefficient=100ppm/°C, Voltage Rating=75V, Case/Package=0603, ComponentLink1Description=http://www.farnell.com/datasheets/1697337.pdf?src-supplier=Element14, ComponentLink1URL=http://www.farnell.com/datasheets/1697337.pdf?src-supplier=Element14, ComponentLink2Description=http://www.farnell.com/datasheets/2111203.pdf?src-supplier=Element14, ComponentLink2URL=http://www.farnell.com/datasheets/2111203.pdf?src-supplier=Element14, ComponentLink3Description=http://www.vishay.com/docs/20035/dcrcwe3.pdf?src-supplier=Digi-Key, ComponentLink3URL=http://www.vishay.com/docs/20035/dcrcwe3.pdf?src-supplier=Digi-Key, ComponentLink4Description=http://www.mouser.com/ds/2/427/dcrcwe3-109170.pdf?src-supplier=Mouser, ComponentLink4URL=http://www.mouser.com/ds/2/427/dcrcwe3-109170.pdf?src-supplier=Mouser, ComponentLink5Description=http://www.vishay.com/docs/20035/dcrcwe3.pdf?src-supplier=Future+Electronics, ComponentLink5URL=http://www.vishay.com/docs/20035/dcrcwe3.pdf?src-supplier=Future+Electronics, Construction=Rectangular, Contact Plating=Tin, Depth=0.85mm, Features="Automotive AEC-Q200", Height=0.45mm, Lead Free="Lead Free", Length=1.55mm, Manufacturer Part Number=CRCW0603536KFKEA, Military Standard=Not, Number of Pins=2, Number of Terminations=2, Packaging="Tape and Reel", Power Rating=100mW, Pricing 1="1=0.1, 10=0.036, 100=0.0145, 1000=0.00652, 2500=0.00566 (USD)", Radiation Hardening=No, REACH SVHC=Unknown, RoHS Compliant=Yes, Series=CRCW, Size Code=0603, Stock 1=9555, Supplier 1=Digi-Key, Technology="THICK FILM", Termination=SMD/SMT, Tolerance=1%, Voltage Rating (DC)=75V, Weight=7.1E-05oz, Width=0.033inch
R28: library part RC0603FR-07453KL, "Res Thick Film 0603 453K Ohm 1% 1/10W ±100ppm/°C Molded SMD Paper T/R", Case Code (Imperial)=0603, Case Code (Metric)=1608, Manufacturer=Yageo, Max Operating Temperature=155°C, Max Power Dissipation=100mW, Min Operating Temperature=-55°C, Resistance=453kR, Resistor Type="Thick Film", Temperature Coefficient=100ppm/°C, Tolerance=1%, Voltage Rating=50V, Case/Package=0603, Category="Chip SMD Resistors", ComponentLink1Description=https://datasheet.ciiva.com/28390/pyu-rc0603-51-rohs-l-4-28390650.pdf?src-supplier=Avnet+Europe, ComponentLink1URL=https://datasheet.ciiva.com/28390/pyu-rc0603-51-rohs-l-4-28390650.pdf?src-supplier=Avnet+Europe, ComponentLink2Description=https://datasheet.ciiva.com/8885/pyu-rc0603-51-rohs-l-4-8885677.pdf?src-supplier=Avnet, ComponentLink2URL=https://datasheet.ciiva.com/8885/pyu-rc0603-51-rohs-l-4-8885677.pdf?src-supplier=Avnet, Construction=Rectangular, Contact Plating=Tin,Matte, Depth=0.8mm, Features="Moisture Resistant", Height=0.45mm, Lead Free="Lead Free", Length=1.6mm, Manufacturer Part Number=RC0603FR-07453KL, Military Standard=Not, Number of Terminations=2, Packaging="Tape and Reel", Power Rating=100mW, Pricing 1="1=0.03580, 10=0.01600, 25=0.01590, 100=0.00730, 500=0.00670 (USD)", RoHS=Yes, RoHS Compliant=Yes, Series=RC, Size Code=0603, Stock 1=507, Supplier 1="Arrow Electronics", Supplier Part Number 1=RC0603FR-07453KL, Termination=SMD/SMT, Voltage Rating (DC)=50V, Width=0.8mm
R29 R30: library part RMCF0603FT5K10, "RES 5.1K OHM 1% 1/10W 0603", Case Code (Imperial)=0603, Case Code (Metric)=1608, Manufacturer="Stackpole Electronics", Max Operating Temperature=155°C, Max Power Dissipation=100mW, Min Operating Temperature=-55°C, Resistance=5.1kR, Resistor Type="Thick Film", Supplier Part Number 1=RMCF0603FT5K10DKR-ND, Temperature Coefficient=100ppm/°C, Tolerance=1%, Case/Package=0603, ComponentLink1Description=https://www.seielect.com/catalog/SEI-RMCF_RMCP.pdf?src-supplier=Avnet, ComponentLink1URL=https://www.seielect.com/catalog/SEI-RMCF_RMCP.pdf?src-supplier=Avnet, ComponentLink2Description=http://components.arrow.com/part/dataview/50863347S9465827N1174?src-supplier=Arrow+Electronics, ComponentLink2URL=http://components.arrow.com/part/dataview/50863347S9465827N1174?src-supplier=Arrow+Electronics, ComponentLink3Description=https://www.seielect.com/catalog/SEI-Packaging.pdf?src-supplier=Digi-Key, ComponentLink3URL=https://www.seielect.com/catalog/SEI-Packaging.pdf?src-supplier=Digi-Key, Contact Plating=Tin,Matte, Features="Automotive AEC-Q200", Height=0.022inch, Length=0.061inch, Manufacturer Part Number=RMCF0603FT5K10, Mount="Surface Mount", Number of Terminations=2, Packaging="Tape and Reel", Pricing 1="1=0.1, 10=0.017, 100=0.0068, 1000=0.00305, 2500=0.00264 (USD)", Radiation Hardening=No, RoHS Compliant=Yes, Series=RMCF, Stock 1=164423, Supplier 1=Digi-Key, Width=0.031inch
R36 R37: library part CRGH0603J100K, "RES SMD 100K OHM 5% 1/5W 0603", Case/Package=0603, Case Code (Metric)=1608, Manufacturer="TE Connectivity", Max Operating Temperature=125°C, Min Operating Temperature=-55°C, Number of Resistors=1, Power Rating=200mW, Resistance=100kR, Resistance Tolerance=5%, Resistor Type="Thick Film,Power resistor", Supplier Part Number 1=A126393DKR-ND, Temperature Coefficient=100ppm/°C, Voltage Rating=50V, Case Code (Imperial)=0603, ComponentLink1Description=http://www.farnell.com/datasheets/2007183.pdf?src-supplier=Element14, ComponentLink1URL=http://www.farnell.com/datasheets/2007183.pdf?src-supplier=Element14, Depth=0.8mm, ELV=Compliant, Height=0.45mm, Length=1.6mm, Manufacturer Part Number=CRGH0603J100K, Mount="Surface Mount", Number of Terminations=2, Packaging="Tape and Reel", Pricing 1="1=0.1, 10=0.049, 100=0.02, 1000=0.00899, 2500=0.0078 (USD)", REACH SVHC="No SVHC", RoHS Compliant=Yes, Series=CRGH, Stock 1=23277, Supplier 1=Digi-Key, Technology="THICK FILM", Termination=Solder, Tolerance=5%, Voltage Rating (DC)=50V, Width=0.8mm
R77 R78: library part RMCF0603FT5K10, "RES 5.1K OHM 1% 1/10W 0603", Case/Package=0603, Case Code (Metric)=1608, Manufacturer="Stackpole Electronics", Max Operating Temperature=155°C, Max Power Dissipation=100mW, Min Operating Temperature=-55°C, Resistance=5.1kR, Resistor Type="Thick Film", Supplier Part Number 1=RMCF0603FT5K10DKR-ND, Temperature Coefficient=100ppm/°C, Tolerance=1%, Case Code (Imperial)=0603, ComponentLink1Description=https://www.seielect.com/catalog/SEI-RMCF_RMCP.pdf?src-supplier=Avnet, ComponentLink1URL=https://www.seielect.com/catalog/SEI-RMCF_RMCP.pdf?src-supplier=Avnet, ComponentLink2Description=http://components.arrow.com/part/dataview/50863347S9465827N1174?src-supplier=Arrow+Electronics, ComponentLink2URL=http://components.arrow.com/part/dataview/50863347S9465827N1174?src-supplier=Arrow+Electronics, ComponentLink3Description=https://www.seielect.com/catalog/SEI-Packaging.pdf?src-supplier=Digi-Key, ComponentLink3URL=https://www.seielect.com/catalog/SEI-Packaging.pdf?src-supplier=Digi-Key, Contact Plating=Tin,Matte, Features="Automotive AEC-Q200", Height=0.022inch, Length=0.061inch, Manufacturer Part Number=RMCF0603FT5K10, Mount="Surface Mount", Number of Terminations=2, Packaging="Tape and Reel", Pricing 1="1=0.1, 10=0.017, 100=0.0068, 1000=0.00305, 2500=0.00264 (USD)", Radiation Hardening=No, RoHS Compliant=Yes, Series=RMCF, Stock 1=58341, Supplier 1=Digi-Key, Width=0.031inch
SB1: "Solder Bridge ON"
SW1: "SWITCH TACTILE SPST-NO 0.05A 12V", Contact Current Rating=50mA, Contact Resistance=100mR, Insulation Resistance=100MR, Manufacturer=Omron, Max Operating Temperature=70°C, Max Voltage Rating (DC)=12V, Min Operating Temperature=-25°C, Operating Force=1.5N, Package Quantity=1, Ratings="Dust Proof,IP40", Supplier Part Number 1=SW1020DKR-ND, Actuator Length=0.4mm, Actuator Type=Standard, ComponentLink1Description=http://www.farnell.com/datasheets/60838.pdf?src-supplier=Farnell, ComponentLink1URL=http://www.farnell.com/datasheets/60838.pdf?src-supplier=Farnell, ComponentLink2Description=http://www.farnell.com/datasheets/60838.pdf?src-supplier=Element14, ComponentLink2URL=http://www.farnell.com/datasheets/60838.pdf?src-supplier=Element14, ComponentLink3Description=https://omronfs.omron.com/en_US/ecb/products/pdf/en-b3u.pdf?src-supplier=Digi-Key, ComponentLink3URL=https://omronfs.omron.com/en_US/ecb/products/pdf/en-b3u.pdf?src-supplier=Digi-Key, ComponentLink4Description=http://www.omron.com/ecb/products/pdf/en-b3u.pdf?src-supplier=Digi-Key, ComponentLink4URL=http://www.omron.com/ecb/products/pdf/en-b3u.pdf?src-supplier=Digi-Key, ComponentLink5Description=https://www.distrelec.biz/Web/Downloads/he/et/B3U_eng_datasheet.pdf?mime=application%2Fpdf&src-supplier=Distrelec, ComponentLink5URL=https://www.distrelec.biz/Web/Downloads/he/et/B3U_eng_datasheet.pdf?mime=application%2Fpdf&src-supplier=Distrelec, ComponentLink6Description=http://www.onlinecomponents.com/productFiles/mf-OM/en-b3u.pdf?src-supplier=Onlinecomponents.com, ComponentLink6URL=http://www.onlinecomponents.com/productFiles/mf-OM/en-b3u.pdf?src-supplier=Onlinecomponents.com, ComponentLink7Description=https://www.verical.com/server-webapp/html/getDatasheet?partID=552554&src-supplier=Verical, ComponentLink7URL=https://www.verical.com/server-webapp/html/getDatasheet?partID=552554&src-supplier=Verical, ComponentLink8Description=http://www.farnell.com/datasheets/1685550.pdf?src-supplier=Element14, ComponentLink8URL=http://www.farnell.com/datasheets/1685550.pdf?src-supplier=Element14, ComponentLink9Description=http://www.farnell.com/datasheets/2610940.pdf?src-supplier=Farnell, ComponentLink9URL=http://www.farnell.com/datasheets/2610940.pdf?src-supplier=Farnell, ComponentLink10Description=https://www.alliedelec.com/m/d/4c8a9ef82804fc3c241a13c1e298fd73.pdf?src-supplier=Allied+Electronics, ComponentLink10URL=https://www.alliedelec.com/m/d/4c8a9ef82804fc3c241a13c1e298fd73.pdf?src-supplier=Allied+Electronics, Contact Material=Silver, Current Rating=50mA, Depth=2.5mm, Electrical Life=200000Cycles, Height=1.2mm, Illumination Type=Non-Illuminated,Illuminated, Lead Free="Lead Free", Length=4mm, Manufacturer Part Number=B3U-1000P, Max Current Rating=50mA, Mechanical Life=200000Cycles, Mount="Surface Mount", Orientation=Straight, Packaging="Tape and Reel", Pricing 1="1=1, 10=0.961, 25=0.9064, 50=0.7976, 100=0.7251, 250=0.68888, 500=0.67074, 1000=0.52571 (USD)", REACH SVHC=Unknown, Stock 1=116454, Supplier 1=Digi-Key, Switch Function=Off-Mom, Switch Travel=0.15mm, Termination=SMD/SMT, Throw Configuration=SPST, Voltage Rating (DC)=12V, Weight=0.000776oz, Width=3mm
U1: "RX TXRX MOD WIFI TRACE ANT SMD", Case/Package=SMD/SMT, Frequency=2.5GHz, Manufacturer="Espressif Systems", Max Operating Temperature=85°C, Min Operating Temperature=-40°C, Supplier Part Number 1=1904-1024-1-ND, ComponentLink1Description=https://www.espressif.com/sites/default/files/documentation/esp32-wroom-32d_esp32-wroom-32u_datasheet_en.pdf?src-supplier=Digi-Key, ComponentLink1URL=https://www.espressif.com/sites/default/files/documentation/esp32-wroom-32d_esp32-wroom-32u_datasheet_en.pdf?src-supplier=Digi-Key, Data Rate=150Mbps, Interface=I2C,SPI,GPIO,PWM,SDIO,UART, Manufacturer Part Number="ESP32-WROOM-32D (8MB)", Memory Size=536KB, Mount="Surface Mount", Packaging="Tape and Reel", Pricing 1="1=4.35000 (USD)", RoHS=No, Sensitivity=-98dBm, Stock 1=2044, Supplier 1=Digi-Key
U2: "IC REG LINEAR 3.3V 1A DPAK", Case/Package=TO-252-3, Dropout Voltage=200mV, Manufacturer=STMicroelectronics, Max Input Voltage=16V, Max Operating Temperature=125°C, Max Output Current=1A, Min Input Voltage=2.6V, Min Operating Temperature=-40°C, Nominal Output Voltage=3.3V, Operating Supply Current=200uA, Package Quantity=2500, Power Supply Rejection Ratio (PSRR)=60dB, Quiescent Current=800uA, Supplier Part Number 1=497-14661-6-ND, Accuracy=2%, ComponentLink1Description=http://www.st.com/st-web-ui/static/active/en/resource/technical/document/datasheet/DM00099995.pdf?src-supplier=Avnet, ComponentLink1URL=http://www.st.com/st-web-ui/static/active/en/resource/technical/document/datasheet/DM00099995.pdf?src-supplier=Avnet, Lead Free="Lead Free", Manufacturer Part Number=LDF33DT-TR, Mount="Surface Mount", Number of Outputs=1, Number of Pins=3, Number of Regulators=1, Output Current=1A, Output Type=Fixed, Output Voltage=3.3V, Packaging="Tape and Reel", Polarity=Positive, Pricing 1="1=0.99, 10=0.868, 25=0.8148, 100=0.6178, 250=0.52576, 500=0.49948, 1000=0.434 (USD)", Radiation Hardening=No, REACH SVHC="No SVHC", RoHS Compliant=Yes, Stock 1=6958, Supplier 1=Digi-Key, Weight=0.012346oz
U3: "IC REG BUCK ADJ 5A TSOT23-6", Case/Package=SOT-23-6, Manufacturer="Texas Instruments", Max Input Voltage=17V, Max Operating Temperature=125°C, Max Output Voltage=7V, Min Input Voltage=4.5V, Min Operating Temperature=-40°C, Min Output Voltage=760mV, Output Current=5A, Supplier Part Number 1=296-47502-6-ND, Switching Frequency=500kHz, ComponentLink1Description=http://www.ti.com/lit/ds/symlink/tps565208.pdf?src-supplier=Farnell, ComponentLink1URL=http://www.ti.com/lit/ds/symlink/tps565208.pdf?src-supplier=Farnell, ComponentLink2Description=http://www.ti.com/lit/ds/symlink/tps565208.pdf?src-supplier=Digi-Key, ComponentLink2URL=http://www.ti.com/lit/ds/symlink/tps565208.pdf?src-supplier=Digi-Key, ComponentLink3Description=http://www.ti.com/lit/ds/symlink/tps565208.pdf?src-supplier=Newark, ComponentLink3URL=http://www.ti.com/lit/ds/symlink/tps565208.pdf?src-supplier=Newark, Manufacturer Part Number=TPS565208DDCT, Mount="Surface Mount", Number of Outputs=1, Output Configuration=Positive, Output Type=Adjustable, Packaging="Tape and Reel", Pricing 1="1=1.75, 10=1.576, 25=1.4868, 100=1.2666 (USD)", RoHS Compliant=Yes, Stock 1=1895, Supplier 1=Digi-Key, Synchronous Rectifier=Yes
U4: "IC OR CTRLR SRC SELECT TSOT23-6", Case/Package=SOT-23-6, Manufacturer="Analog Devices / Linear Technology", Max Operating Temperature=85°C, Min Operating Temperature=-40°C, Operating Supply Current=15uA, Package Quantity=2500, Supplier Part Number 1=LTC4412IS6#TRPBFCT-ND, Category=Uncategorized, ComponentLink1Description=https://datasheet.ciiva.com/1960/1527-1960891.pdf?src-supplier=Digi-Key, ComponentLink1URL=https://datasheet.ciiva.com/1960/1527-1960891.pdf?src-supplier=Digi-Key, Length=2.9mm, Manufacturer Part Number=LTC4412IS6#TRPBF, Number of Pins=6, Packaging="Tape and Reel", Pricing 1="1=3.90000, 10=3.50700, 25=3.31520, 100=2.87310, 250=2.72580, 500=2.44584, 1000=2.08500 (USD)", RoHS=Yes, RoHS Compliant=Yes, Series=PowerPath™, Stock 1=2608, Supplier 1=Digi-Key, Turn-Off Delay Time=13us, Turn-On Delay Time=110us
U6: "LOAD CELL AMP HX711", Package=SOP-16L, Manufacturer Part No=HX711
U7 U8 U19: "IC BUF NON-INVERT 5.5V SOT23-5", Case/Package=SOT-23-5, High Level Output Current=-8mA, Low Level Output Current=8mA, Manufacturer="Texas Instruments", Max Operating Temperature=125°C, Max Supply Voltage=5.5V, Min Operating Temperature=-40°C, Min Supply Voltage=1.6V, Package Quantity=3000, Quiescent Current=1uA, Supplier Part Number 1=296-37176-6-ND, ComponentLink1Description=http://www.ti.com/lit/pdf/sdyu001?src-supplier=Digi-Key, ComponentLink1URL=http://www.ti.com/lit/pdf/sdyu001?src-supplier=Digi-Key, ComponentLink2Description=http://www.ti.com/lit/ds/symlink/sn74lv1t34.pdf?src-supplier=Avnet, ComponentLink2URL=http://www.ti.com/lit/ds/symlink/sn74lv1t34.pdf?src-supplier=Avnet, Lead Free="Lead Free", Logic Function=Buffer,Inverting, Manufacturer Part Number=SN74LV1T34DBVR, Mount="Surface Mount", Number of Bits=1, Number of Bits per Element=1, Number of Channels=1, Number of Elements=1, Number of Input Lines=1, Number of Inputs=1, Number of Output Lines=1, Number of Outputs=1, Number of Pins=5, Operating Supply Current=8mA, Packaging="Tape and Reel", Polarity=Non-Inverting, Pricing 1="1=0.43, 10=0.349, 25=0.3192, 100=0.2374, 250=0.2152, 500=0.17808, 1000=0.13356 (USD)", Propagation Delay=15.5ns, Radiation Hardening=No, REACH SVHC="No SVHC", RoHS Compliant=Yes, Stock 1=37360, Supplier 1=Digi-Key, Weight=0.000353oz